# Altium PCB FC_RGB.PcbDoc
Units mil, origin at the board's own origin, x right, y up, seen from the top; angles counter-clockwise.
Board outline 3865.84 x 2095.61 mil, 2 copper layers (Top Layer, Bottom Layer); 76 components, 155 nets, 489 pads, 66 vias.
Unrouted connection lines stored in the file: 5.
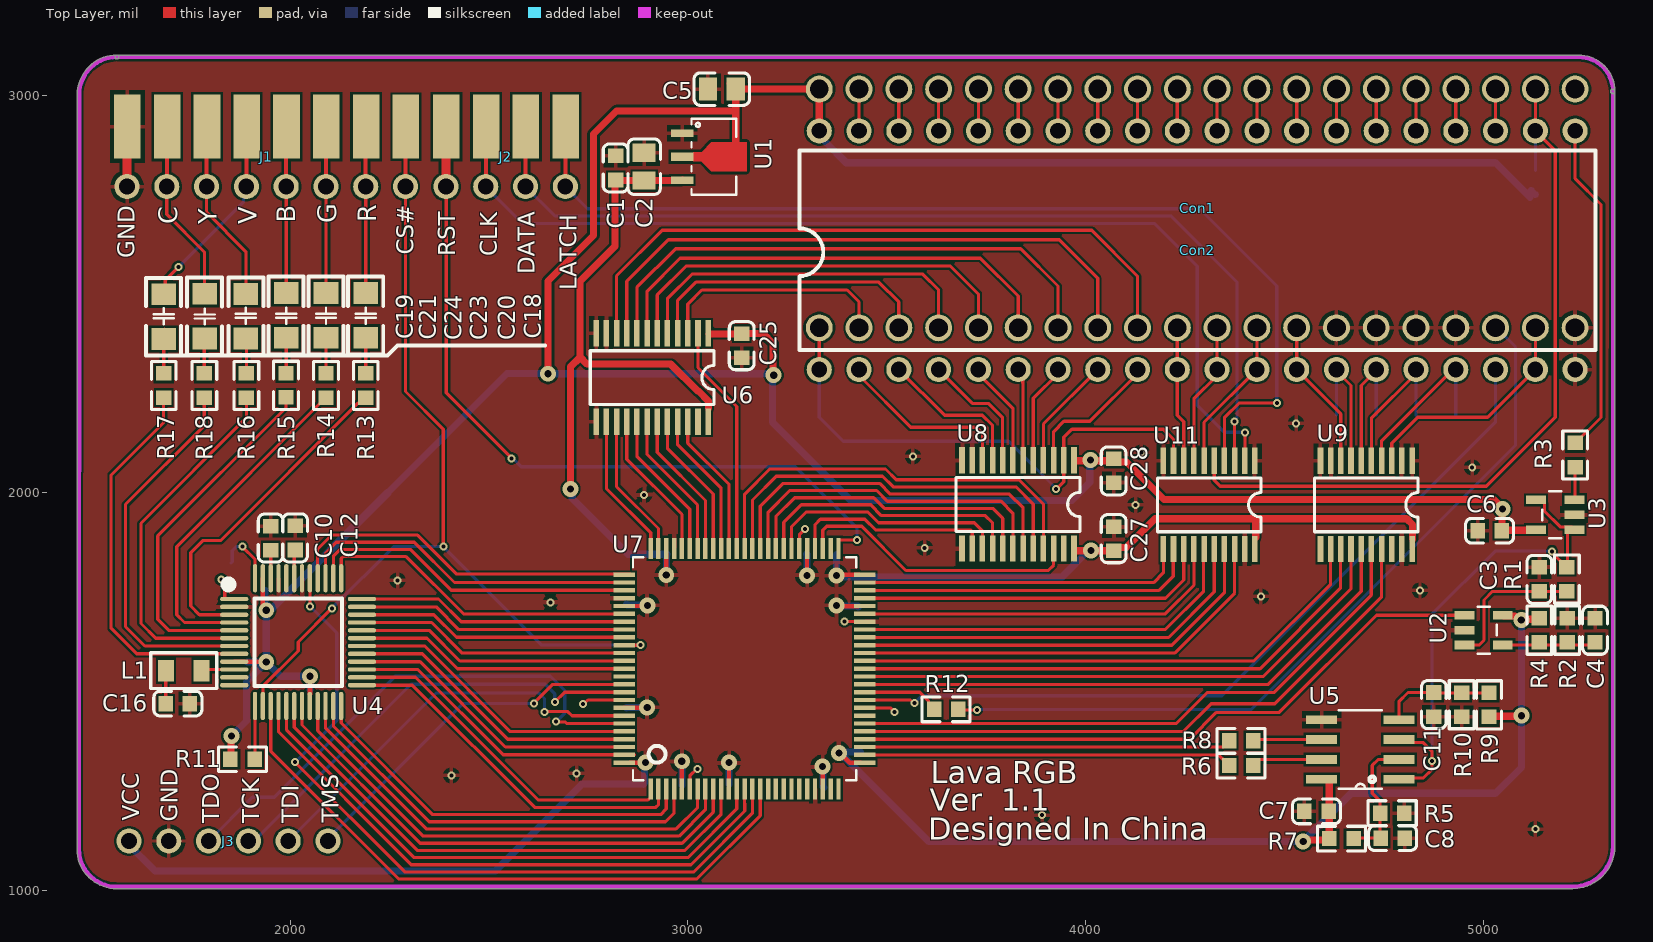
[diagram p0: Top Layer view]
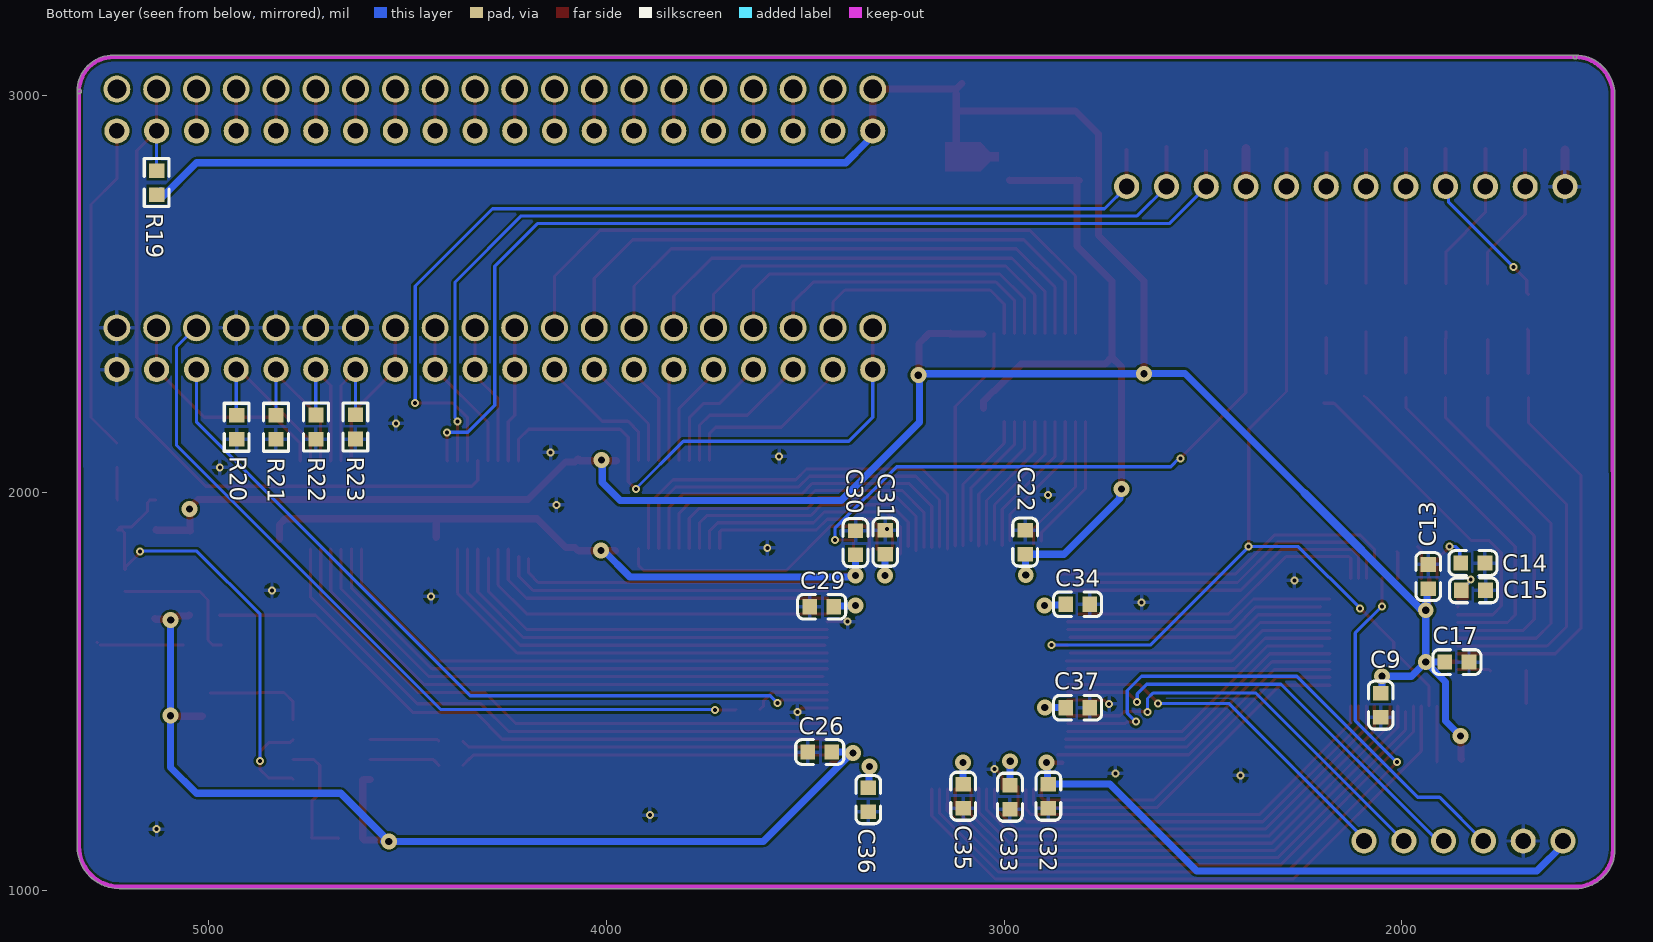
[diagram p1: Bottom Layer view, seen from below]
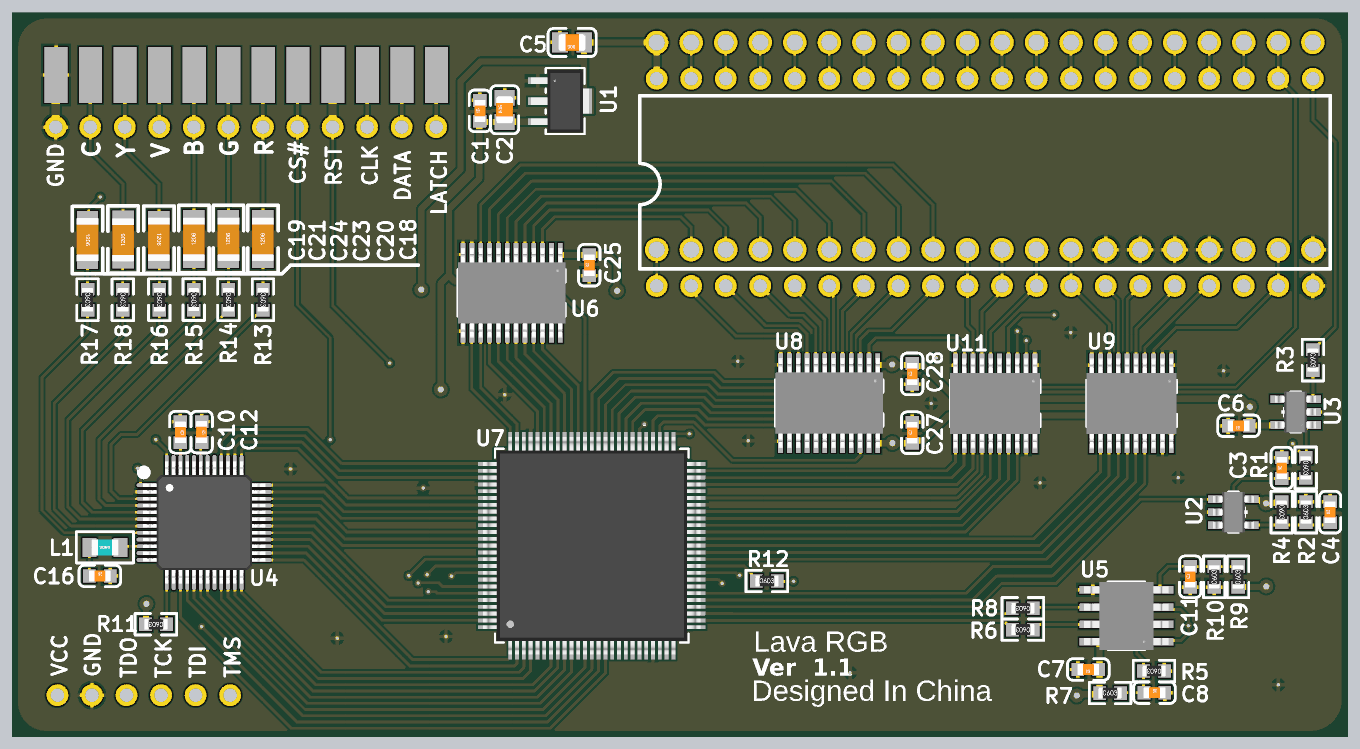
[diagram p2: 3D render of the assembled board from above, using the file's embedded part models]
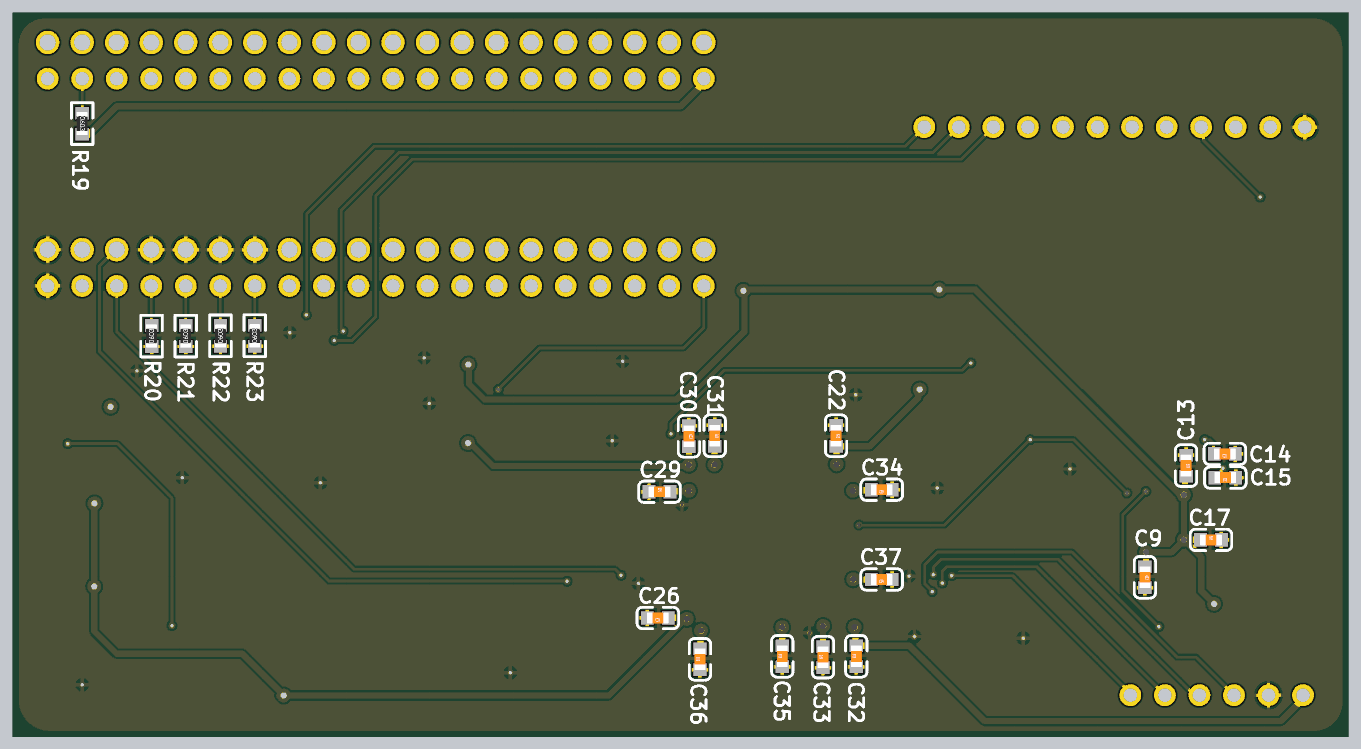
[diagram p3: 3D render of the assembled board from below, using the file's embedded part models]

## Layer stack, top to bottom
Top Solder: solder mask 0.4, Solder Resist, Dk 3.5
Top Layer: signal copper 1.4
Dielectric 1: dielectric 12.6, FR-4, Dk 4.8
Bottom Layer: signal copper 1.4
Bottom Solder: solder mask 0.4, Solder Resist, Dk 3.5

## Board outline
1464.28,1104.59 ccw(c1564.06,1104.83) 1564.15,1005.05 5223.7,1005.39 ccw(c5223.7,1010.38) 5223.71,1005.39 ccw(c5223.46,1111.67) 5329.74,1111.67 ccw(c5223.46,1111.67) 5329.74,1111.77 5330.12,3009.32 cw(c5324.69,3009.32) 5330.12,3009.33 ccw(c5238.72,3009.11) 5238.63,3100.52 1564.58,3100.67 cw(c1564.57,3095.7) 1564.57,3100.67 ccw(c1564.8,3000.84) 1464.98,3000.74 1464.28,1104.61 ccw(c1469.13,1104.61)

## Design rules (kind name [scope] priority, off if disabled: settings)
Clearance [All] p1: gap=6 ignorepadtopadclearanceinfootprint=FALSE except(0: Arc-Hole Track-Hole SMDPad-Hole THPad-Hole Via-Hole Fill-Hole Poly-Hole Region-Hole Text-Hole)
PolygonConnect [All] p1: connectstyle=Relief reliefconductorwidth=10 reliefentries=4 polygonreliefangle="90 Angle" airgapwidth=10
RoutingVias [All] p1: holewidth=28 width=50 viastyle="Through Hole" minholewidth=28 minwidth=50 maxholewidth=28 maxwidth=50
SilkToSolderMaskClearance [IsPad] p1: minsilkscreentomaskgap=6 clearancetoexposedcopper=TRUE
SolderMaskExpansion [All] p1: expansion=4 istentingtop=FALSE
Width Width_3V3 [InNet('+3.3')] p1: maxlimit=30 minlimit=10 preferedwidth=18 minimp=50.000000 maximp=50.000000 favimp=50.000000
Width Width_5V [InNet('+5')] p2: maxlimit=30 minlimit=10 preferedwidth=18 minimp=50.000000 maximp=50.000000 favimp=50.000000
Width [All] p3: maxlimit=38 minlimit=8 preferedwidth=8 minimp=50.000000 maximp=50.000000 favimp=50.000000
29 further rules are at their usual default settings.

## Components (designator, comment, footprint, x,y, rotation, side; value= is the part's Value field where it differs from the comment)
C1 "100nF" 0603_C 2818.04,2816.76 r90 top
C2 "2.2uF" 0805_C 2890,2820 r90 top
C3 "0.2nF" 0603_C 5140.05,1782.62 r90 top
C4 "100nF" 0603_C 5279.89,1654.79 r90 top
C5 "2.2uF" 0805_C 3085.04,3015 r180 top
C6 "100nF" 0603_C 5015,1905 r180 top
C7 "100nF" 0603_C 4579.87,1199.5 r180 top
C8 "0.2nF" 0603_C 4771.23,1132.2 r0 top
C9 "100nF" 0603_C 2053.01,1466.41 r270 bottom
C10 "100nF" 0603_C 2012.55,1886.82 r270 top
C11 "0.2nF" 0603_C 4874.91,1467.98 r90 top
C12 "100nF" 0603_C 1950.91,1886.41 r270 top
C13 "100nF" 0603_C 1933.65,1789.8 r270 bottom
C14 "100nF" 0603_C 1821.35,1823.75 r0 bottom
C15 "100nF" 0603_C 1820,1755 r0 bottom
C16 "27pF" 0603_C 1717.72,1470.38 r0 top
C17 "100nF" 0603_C 1861.52,1574.81 r180 bottom
C18 "220uF" "C 1206_L" 2190,2445 r90 top
C19 "220uF" "C 1206_L" 1682,2444.24 r270 top
C20 "220uF" "C 1206_L" 2090,2445 r90 top
C21 "0.047uF" "C 1206_L" 1785.19,2443.44 r90 top
C22 "100nF" 0603_C 2946.9,1876.22 r270 bottom
C23 "220uF" "C 1206_L" 1990,2445 r90 top
C24 "220uF" "C 1206_L" 1888.7,2445.06 r270 top
C25 "100nF" 0603_C 3135,2370 r90 top
C26 "100nF" 0603_C 3463.16,1348.65 r0 bottom
C27 "100nF" 0603_C 4070,1885 r90 top
C28 "100nF" 0603_C 4070,2055.32 r90 top
C29 "100nF" 0603_C 3458.4,1713.98 r180 bottom
C30 "100nF" 0603_C 3373.29,1874.82 r270 bottom
C31 "100nF" 0603_C 3298.51,1876.22 r270 bottom
C32 "100nF" 0603_C 2888.44,1237.52 r90 bottom
C33 "100nF" 0603_C 2985,1235 r90 bottom
C34 "100nF" 0603_C 2815,1720 r0 bottom
C35 "100nF" 0603_C 3102.78,1237.52 r90 bottom
C36 "100nF" 0603_C 3341.29,1228.97 r90 bottom
C37 "100nF" 0603_C 2815,1460 r0 bottom
Con1 "PPU_Connector_Src" DIP40_SRC 4280,2715 r90 top locked
Con2 "PPU_Connector_Dest" DIP40_DEST 4280,2610 r90 top locked
J1 "VOut_Connecter_8P" CON_VIDEO_OUT_8P 1290.97,2920.8 r0 top
J2 "JOY_Switch" CON_JOY 2692.67,2895.8 r180 top
J3 "PROGRAM_Conector" CON_PROGRAM 1595,1125 r0 top
L1 "68uH" "L 0805" 1732.67,1553.08 r180 top
R1 "680Ω" 0603_R 5209.32,1783.2 r270 top
R2 "680Ω" 0603_R 5209.99,1654.91 r90 top
R3 "100Ω" 0603_R 5230,2095.32 r270 top
R4 "10KΩ" 0603_R 5140,1655 r270 top
R5 "10KΩ" 0603_R 4770,1195 r180 top
R6 "100Ω" 0603_R 4390.43,1314.82 r180 top
R7 "16KΩ" 0603_R 4642.74,1131.13 r0 top
R8 "100Ω" 0603_R 4390.39,1376.74 r180 top
R9 "7.15KΩ" 0603_R 5013.55,1467.39 r90 top
R10 "10KΩ" 0603_R 4944.53,1467.51 r90 top
R11 "300Ω" 0603_R 1880.24,1330.44 r180 top
R12 "100Ω" 0603_R 3648.9,1455.84 r0 top
R13 "75Ω" 0603_R 2190,2270 r270 top
R14 "75Ω" 0603_R 2090,2270 r270 top
R15 "75Ω" 0603_R 1989.52,2270.38 r270 top
R16 "75Ω" 0603_R 1890,2270 r270 top
R17 "75Ω" 0603_R 1682.33,2270 r270 top
R18 "75Ω" 0603_R 1784.26,2270 r270 top
R19 "100KΩ" 0603_R 5130,2780 r270 bottom
R20 "10KΩ" 0603_R 4928.88,2165 r90 bottom
R21 "10KΩ" 0603_R 4830,2165 r90 bottom
R22 "10KΩ" 0603_R 4729.51,2165.5 r90 bottom
R23 "10KΩ" 0603_R 4630.31,2165.77 r90 bottom
U1 "MCP1703T-3302E/MB" SOT-89_3MC_MCH 3065,2845 r270 top
U2 "LMV7219M5X" MF05A 5000,1655 r0 top
U3 "SGM8051XN5/TR" MF05A 5180,1945 r180 top
U4 "BH7240AKV" LQFP48-7*7 2020,1625 r270 top locked
U5 "TLV3502AIDR" D8 4690,1355 r180 top
U6 "SN74LVC4245APWR" PW24 2910,2290 r270 top locked
U7 "LCMXO2-1200HC-4TG100I" TQFP100_LAT 3142.25,1558.11 r90 top locked
U8 "SN74LVC4245APWR" PW24 3829.57,1971 r270 top locked
U9 "SN74LVC541APW" PW20 4705,1970 r270 top locked
U11 "SN74LVC541APW" PW20 4310,1970 r270 top locked (schematic designator U1)

## Footprints (in the part's own frame and the unit in brackets; to place one, negate y for a bottom-side part, rotate by r counter-clockwise, add the part's x,y. Pads: shape width x height; smd on the part's side, far side on the other; paste and mask are expansions set on the pad)
0603_C [mm]
  rect 0.93x0.98 smd: 1(-0.77,0) 2(0.77,0)
  silkscreen extent -1.53,-0.79 1.54,0.79, body extent -0.8,-0.4 0.8,0.4, height 0.3
0603_R [mm]
  rect 0.93x0.98 smd: 1(-0.77,0) 2(0.77,0)
  silkscreen extent -1.53,-0.79 1.54,0.79, body extent -0.85,-0.4 0.85,0.4, height 0.56
0805_C [mm]
  rect 1.16x1.47 smd: 1(-0.89,0) 2(0.89,0)
  silkscreen extent -1.77,-1.04 1.77,1.04, body extent -1,-0.62 1,0.63, height 0.77
"C 1206_L" [mil] "无极性贴片电容"
  rect 55x62 smd: 1(-55.12,0) 2(57.09,0)
  silkscreen extent -96,-44 98,44, body extent -63,-32 63,32, height 48
CON_JOY [mm]
  rect 1.7x4.1 smd: 1(0,-0.635) 2(2.54,-0.635) 3(5.08,-0.635) 4(7.62,-0.635)
  round 1.6 hole 1: 1(0.025,3.195) 2(2.565,3.195) 3(5.105,3.195) 4(7.645,3.195)
  Top Layer lines w0.254: 5.105,3.195 5.105,0.914 ; 2.565,3.195 2.565,0.66 ; 0.025,3.195 0.025,0.864
  Top Layer lines w0.6: 7.645,3.195 7.645,0.787
CON_PROGRAM [mm]
  round 1.6 hole 1: 1(0,0) 2(2.54,0) 3(5.08,0) 4(7.62,0) 5(10.16,0) 6(12.7,0)
CON_VIDEO_OUT_8P [mm]
  round 1.6 hole 1: 1(7.595,-3.83) 2(10.135,-3.83) 3(12.675,-3.83) 4(15.215,-3.83) 5(17.755,-3.83) 6(20.295,-3.83) 7(22.835,-3.83) 8(25.375,-3.83)
  rect 1.7x4.1 smd: 1(7.62,0) 2(10.16,0) 3(12.7,0) 4(15.24,0) 5(17.78,0) 6(20.32,0) 7(22.86,0) 8(25.4,0)
  Top Layer lines w0.254: 10.135,-3.83 10.135,-1.499 ; 12.675,-3.83 12.675,-1.422 ; 15.215,-3.83 15.215,-1.422 ; 17.755,-3.83 17.755,-1.422 ; 20.295,-3.83 20.295,-1.499 ; 22.835,-3.83 22.835,-1.676 ; 25.375,-3.83 25.375,-1.422
  Top Layer lines w0.6: 7.595,-3.83 7.595,-1.499
D8 [mil]
  rect 78x22 smd: 1(-97,75) 2(-97,25) 3(-97,-25) 4(-97,-75) 5(97,-75) 6(97,-25) 7(97,25) 8(97,75)
  silkscreen extent -54,-98 54,98, body extent -122,-99 122,99, height 69
DIP40_DEST [mm]
  round 1.6 hole 1: 1(-7.62,24.13) 2(-7.62,21.59) 3(-7.62,19.05) 4(-7.62,16.51) 5(-7.62,13.97) 6(-7.62,11.43) 7(-7.62,8.89) 8(-7.62,6.35) 9(-7.62,3.81) 10(-7.62,1.27) 11(-7.62,-1.27) 12(-7.62,-3.81) 13(-7.62,-6.35) 14(-7.62,-8.89) 15(-7.62,-11.43) 16(-7.62,-13.97) 17(-7.62,-16.51) 18(-7.62,-19.05) 19(-7.62,-21.59) 20(-7.62,-24.13) 21(7.62,-24.13) 22(7.62,-21.59) 23(7.62,-19.05) 24(7.62,-16.51) 25(7.62,-13.97) 26(7.62,-11.43) 27(7.62,-8.89) 28(7.62,-6.35) 29(7.62,-3.81) 30(7.62,-1.27) 31(7.62,1.27) 32(7.62,3.81) 33(7.62,6.35) 34(7.62,8.89) 35(7.62,11.43) 36(7.62,13.97) 37(7.62,16.51) 38(7.62,19.05) 39(7.62,21.59) 40(7.62,24.13)
  silkscreen extent -6.36,-25.42 6.37,25.38
DIP40_SRC [mm]
  round 1.72 hole 1.2: 1(-7.62,24.13) 2(-7.62,21.59) 3(-7.62,19.05) 4(-7.62,16.51) 5(-7.62,13.97) 6(-7.62,11.43) 7(-7.62,8.89) 8(-7.62,6.35) 9(-7.62,3.81) 10(-7.62,1.27) 11(-7.62,-1.27) 12(-7.62,-3.81) 13(-7.62,-6.35) 14(-7.62,-8.89) 15(-7.62,-11.43) 16(-7.62,-13.97) 17(-7.62,-16.51) 18(-7.62,-19.05) 19(-7.62,-21.59) 20(-7.62,-24.13) 21(7.62,-24.13) 22(7.62,-21.59) 23(7.62,-19.05) 24(7.62,-16.51) 25(7.62,-13.97) 26(7.62,-11.43) 27(7.62,-8.89) 28(7.62,-6.35) 29(7.62,-3.81) 30(7.62,-1.27) 31(7.62,1.27) 32(7.62,3.81) 33(7.62,6.35) 34(7.62,8.89) 35(7.62,11.43) 36(7.62,13.97) 37(7.62,16.51) 38(7.62,19.05) 39(7.62,21.59) 40(7.62,24.13)
"L 0805" [mil] "小功率贴片电感"
  rect 40x55 smd: 1(-45,0) 2(45,0)
  silkscreen extent -83,-45 83,45, body extent -39,-24 39,24, height 35
LQFP48-7*7 [mm] "7x7mm，0.5mm"
  oval 0.279x1.8 smd: 1(-2.75,-4.075) 2(-2.25,-4.075) 3(-1.75,-4.075) 4(-1.25,-4.075) 5(-0.75,-4.075) 6(-0.25,-4.075) 7(0.25,-4.075) 8(0.75,-4.075) 9(1.25,-4.075) 10(1.75,-4.075) 11(2.25,-4.075) 12(2.75,-4.075) 25(2.75,4.075) 26(2.25,4.075) 27(1.75,4.075) 28(1.25,4.075) 29(0.75,4.075) 30(0.25,4.075) 31(-0.25,4.075) 32(-0.75,4.075) 33(-1.25,4.075) 34(-1.75,4.075) 35(-2.25,4.075) 36(-2.75,4.075)
  oval 1.8x0.279 smd: 13(4.075,-2.75) 14(4.075,-2.25) 15(4.075,-1.75) 16(4.075,-1.25) 17(4.075,-0.75) 18(4.075,-0.25) 19(4.075,0.25) 20(4.075,0.75) 21(4.075,1.25) 22(4.075,1.75) 23(4.075,2.25) 24(4.075,2.75) 37(-4.075,2.75) 38(-4.075,2.25) 39(-4.075,1.75) 40(-4.075,1.25) 41(-4.075,0.75) 42(-4.075,0.25) 43(-4.075,-0.25) 44(-4.075,-0.75) 45(-4.075,-1.25) 46(-4.075,-1.75) 47(-4.075,-2.25) 48(-4.075,-2.75)
  silkscreen extent -3.93,-4.69 2.79,2.79, body extent -4.5,-4.5 4.5,4.5, height 1.45
MF05A [mil]
  rect 50x22 smd: 1(-48,37.5) 2(-48,0) 3(-48,-37.5) 4(48,-37.5) 5(48,37.5)
  silkscreen extent -15,-59 33,59, body extent -59,-59 59,59, height 48
PW20 [mil]
  rect 66x14 smd: 1(-111,115.16) 2(-111,89.57) 3(-111,63.98) 4(-111,38.39) 5(-111,12.8) 6(-111,-12.8) 7(-111,-38.39) 8(-111,-63.98) 9(-111,-89.57) 10(-111,-115.16) 11(111,-115.16) 12(111,-89.57) 13(111,-63.98) 14(111,-38.39) 15(111,-12.8) 16(111,12.8) 17(111,38.39) 18(111,63.98) 19(111,89.57) 20(111,115.16)
  silkscreen extent -68,-130 68,130, body extent -130,-130 130,130, height 47
PW24 [mil]
  rect 66x14 smd: 1(-111,140.75) 2(-111,115.16) 3(-111,89.57) 4(-111,63.98) 5(-111,38.39) 6(-111,12.8) 7(-111,-12.8) 8(-111,-38.39) 9(-111,-63.98) 10(-111,-89.57) 11(-111,-115.16) 12(-111,-140.75) 13(111,-140.75) 14(111,-115.16) 15(111,-89.57) 16(111,-63.98) 17(111,-38.39) 18(111,-12.8) 19(111,12.8) 20(111,38.39) 21(111,63.98) 22(111,89.57) 23(111,115.16) 24(111,140.75)
  silkscreen extent -67,-156 68,156, body extent -130,-156 130,156, height 47
SOT-89_3MC_MCH [mil]
  rect 19x56 smd paste+0 mask+0: 1(-59.06,-79.18) 3(59.06,-79.18)
  rect 22x56 smd paste+0 mask+0: 2(0,-79.18)
  Top Layer region: 11,-51.18 -11,-51.18 -11,-30.82 -37,-6.82 -37,83.18 37,83.18 37,-6.82 11,-31.82
  silkscreen extent -96,-56 96,56, body extent -91,-99 91,69, height 65
TQFP100_LAT [mil]
  rect 53.5x11 smd paste+0 mask+0: 1(-302.25,236.22) 2(-302.25,216.54) 3(-302.25,196.85) 4(-302.25,177.17) 5(-302.25,157.48) 6(-302.25,137.8) 7(-302.25,118.11) 8(-302.25,98.43) 9(-302.25,78.74) 10(-302.25,59.06) 11(-302.25,39.37) 12(-302.25,19.69) 13(-302.25,0) 14(-302.25,-19.68) 15(-302.25,-39.37) 16(-302.25,-59.06) 17(-302.25,-78.74) 18(-302.25,-98.43) 19(-302.25,-118.11) 20(-302.25,-137.8) 21(-302.25,-157.48) 22(-302.25,-177.17) 23(-302.25,-196.85) 24(-302.25,-216.54) 25(-302.25,-236.22) 51(302.25,-236.22) 52(302.25,-216.54) 53(302.25,-196.85) 54(302.25,-177.17) 55(302.25,-157.48) 56(302.25,-137.8) 57(302.25,-118.11) 58(302.25,-98.43) 59(302.25,-78.74) 60(302.25,-59.06) 61(302.25,-39.37) 62(302.25,-19.68) 63(302.25,0) 64(302.25,19.68) 65(302.25,39.37) 66(302.25,59.06) 67(302.25,78.74) 68(302.25,98.43) 69(302.25,118.11) 70(302.25,137.8) 71(302.25,157.48) 72(302.25,177.17) 73(302.25,196.85) 74(302.25,216.54) 75(302.25,236.22)
  rect 11x53.5 smd paste+0 mask+0: 26(-236.22,-302.25) 27(-216.54,-302.25) 28(-196.85,-302.25) 29(-177.17,-302.25) 30(-157.48,-302.25) 31(-137.8,-302.25) 32(-118.11,-302.25) 33(-98.43,-302.25) 34(-78.74,-302.25) 35(-59.06,-302.25) 36(-39.37,-302.25) 37(-19.69,-302.25) 38(0,-302.25) 39(19.68,-302.25) 40(39.37,-302.25) 41(59.06,-302.25) 42(78.74,-302.25) 43(98.43,-302.25) 44(118.11,-302.25) 45(137.8,-302.25) 46(157.48,-302.25) 47(177.17,-302.25) 48(196.85,-302.25) 49(216.54,-302.25) 50(236.22,-302.25) 76(236.22,302.25) 77(216.54,302.25) 78(196.85,302.25) 79(177.17,302.25) 80(157.48,302.25) 81(137.8,302.25) 82(118.11,302.25) 83(98.43,302.25) 84(78.74,302.25) 85(59.06,302.25) 86(39.37,302.25) 87(19.68,302.25) 88(0,302.25) 89(-19.69,302.25) 90(-39.37,302.25) 91(-59.06,302.25) 92(-78.74,302.25) 93(-98.43,302.25) 94(-118.11,302.25) 95(-137.8,302.25) 96(-157.48,302.25) 97(-177.17,302.25) 98(-196.85,302.25) 99(-216.54,302.25) 100(-236.22,302.25)
  silkscreen extent -280,-280 280,280, body extent -315,-315 315,315, height 63

## Part data
C1 C3 C4 C6 C7 C8 C9 C10 C11 C12 C13 C14 C15 C16 C17 C22 C25 C26 C27 C28 C29 C30 C31 C32 C33 C34 C35 C36 C37: library part C0603, "No Description Available", Manufacturer_Part_Number=C0603X394K4RACAUTO, Mfr_Name=Kemet, Copyright="Copyright (C) 2022 Ultra Librarian. All rights reserved.", RefDes=RefDes, Type=DEV
C2 C5: library part C0805, "No Description Available", Manufacturer_Part_Number=C0603X394K4RACAUTO, Mfr_Name=Kemet, Copyright="Copyright (C) 2022 Ultra Librarian. All rights reserved.", RefDes=RefDes, Type=DEV
C18 C19 C20 C21 C23 C24: library part C1206, "No Description Available", Manufacturer_Part_Number=C0603X394K4RACAUTO, Mfr_Name=Kemet, Copyright="Copyright (C) 2022 Ultra Librarian. All rights reserved.", RefDes=RefDes, Type=DEV
L1: library part L0805
R1 R2 R3 R4 R5 R6 R7 R8 R9 R10 R11 R12 R13 R14 R15 R16 R17 R18 R19 R20 R21 R22 R23: library part R0603, "No Description Available", Manufacturer_Part_Number=RC0603FR-07200RL, Mfr_Name=Yageo, Copyright="Copyright (C) 2022 Ultra Librarian. All rights reserved.", RefDes=RefDes, Type=DEV
U1: "No Description Available", Mfr_Name=Microchip, Copyright="Copyright (C) 2022 Ultra Librarian. All rights reserved.", Manufacturer_Part_Number=MCP1703T-3302E/MB, RefDes=RefDes, Type=DEV
U2: "C14A", Manufacturer_Part_Number=MCP1703T-3302E/MB, Mfr_Name=Microchip, Copyright="Copyright (C) 2022 Ultra Librarian. All rights reserved.", RefDes=RefDes, Type=DEV
U3: library part SGM808051XN5/TR, "8051", Manufacturer_Part_Number=MCP1703T-3302E/MB, Mfr_Name=Microchip, Copyright="Copyright (C) 2022 Ultra Librarian. All rights reserved.", RefDes=RefDes, Type=DEV
U4: "No Description Available", Manufacturer_Part_Number=ADV7123JSTZ330, Mfr_Name="Analog Devices Inc", Copyright="Copyright (C) 2022 Ultra Librarian. All rights reserved.", RefDes=RefDes, Type=DEV
U5: library part TLV3502AIDCNR, "NXC", Mfr_Name="Texas Instruments", Copyright="Copyright (C) 2022 Ultra Librarian. All rights reserved.", Manufacturer_Part_Number=TLV3502AIDCNR, RefDes=RefDes, Type=DEV
U6 U8: "LJ245A", Mfr_Name="Texas Instruments", Copyright="Copyright (C) 2022 Ultra Librarian. All rights reserved.", Manufacturer_Part_Number=SN74LVC4245APWR, RefDes=RefDes, Type=DEV
U7: library part LCMXO2-1200HC, "No Description Available", Mfr_Name=Lattice, Copyright="Copyright (C) 2023 Ultra Librarian. All rights reserved.", Manufacturer_Part_Number=LCMXO2-1200HC-4TG100I, RefDes=RefDes, Type=DEV
U9 U11: "LC541A", Mfr_Name="Texas Instruments", Copyright="Copyright (C) 2022 Ultra Librarian. All rights reserved.", Manufacturer_Part_Number=SN74LVC541APW, RefDes=RefDes, Type=DEV

## Via types
v1: diameter 20, hole 10, Top Layer to Bottom Layer, tented both sides, 42 vias
v2: diameter 40, hole 18, Top Layer to Bottom Layer, tented both sides, 24 vias

## Nets (pads, with @x,y where several pads share a name; then routed paths per layer and width w, separated by ;. In a path a pad name is that pad's centre, name@x,y a point inside that pad or via, vN(x,y) a via of type N, cw(c..) or ccw(c..) an arc to the next point about the centre after c; other vN are vias at no path point)
+3.3: C1.1 C2.1 C7.1 C22.2 C26.1 C27.1 C29.2 C30.2 C31.2 C32.2 C33.2 C34.2 C35.2 C36.2 C37.2 J3.1 R4.1 R7.1 R9.1 U1.3 U2.5 U5.8 U6.24 U7.5 U7.11 U7.23 U7.26 U7.46 U7.50 U7.55 U7.73 U7.80 U7.93 U7.100 U8.24 U9.20 U11.20 | length 8679.2
  Top Layer w11: U7.93 v2@2894.68,1459.68 ; U7.100@2853.54,1321.94 v2@2893.04,1321.94 ; U7.80@2857.7,1715.74 v2@2890,1715.74 ; v2(2945.33,1793.32) U7.73@2945.33,1848 ; U7.5@2984.48,1270.7 v2(2984.48,1325.39) ; U7.11@3103.18,1267.61 v2@3103.18,1322.03 ; v2(3299.32,1792.6) U7.55@3299.32,1847.29 ; U7.23@3339.14,1266.14 v2@3339.14,1305 ; v2@3374.76,1715.41 U7.46@3427.98,1715.41 ; v2@3375.93,1794.17 U7.50@3430.62,1794.17 ; v2(3379.38,1346) 3382.31,1346 3406.65,1321.66 U7.26@3434.59,1321.66
  Top Layer w18: v2(2705,2010) 2705,2317.1 2728.95,2341.05 ; C1.1@2810,2784.96 2875,2784.96 2875.49,2785.45 2985.33,2785.45 U1.3 ; C1.1 2816.18,2784.58 2816.18,2619.56 2728.95,2532.34 2728.95,2341.05 ; v2@2895.43,1458.62 v2(2897.46,1460.64) ; v2@2897.8,1716.69 v2(2898.14,1717.03) v2@2898.82,1717.72 ; 3024.32,2256 2956.71,2323.6 2746.4,2323.6 2728.95,2341.05 ; 3026.2,2255.95 3051.16,2231 U6.24@3051.16,2211.74 ; v2@3098.93,1332.67 3098.93,1326.24 v2(3103.14,1322.03) v2@3103.14,1327.98 ; v2(3299.32,1792.6) v2@3299.6,1792.32 ; v2@3372.85,1792.32 v2(3373.14,1792.03) ; v2(3373.14,1717.03) 3374.76,1715.41 v2@3376.26,1713.91 ; U8.24@3976.37,1854.73 C27.1 ; C27.1 4078.05,1862.74 4101.73,1862.74 4173.99,1935 4427.32,1935 ; U11.20@4427.32,1888.09 4427.32,1935 ; v2(4546.4,1124.13) 4549.95,1127.68 4608.4,1127.68 4611.95,1131.23 4611.95,1278 4609.95,1280 U5.8 ; U9.20@4821.05,1883 4821.05,1920.41 4806.46,1935 4427.32,1935 ; R9.1@5015.5,1439.03 5016,1438.53 5093.65,1438.53 v2(5095.1,1439.98) ; U2.5 5050,1690.5 5078.67,1690.5 5088.71,1680.46 v2(5094.66,1680.46) 5096.63,1682.43 5132.78,1682.43 R4.1@5134.75,1684.4
  Bottom Layer w18: J3.1 1595,1115 1660,1050 2516.01,1050 2734.06,1268.05 C32.2@2888.22,1268.05 ; v2(2705,2010) 2709.21,2005.79 2709.21,1985.79 2849.1,1845.9 C22.2@2945.92,1845.9 ; C37.2 2845.64,1460.32 2897.14,1460.32 v2(2897.46,1460.64) ; C34.2 2846.8,1718.52 2896.65,1718.52 v2(2898.14,1717.03) ; C32.2 C32.2@2888.22,1268.05 ; v2(2893.4,1322.31) 2890.92,1319.83 2890.92,1270.76 C32.2@2888.22,1268.05 ; v2(2945.33,1793.32) 2946.11,1794.11 2946.11,1845.11 C22.2 ; v2(2984.48,1325.39) 2984.74,1325.13 2984.74,1265.57 C33.2 ; C35.2 3102.96,1268.01 3102.96,1321.86 v2(3103.14,1322.03) ; C31.2 3298.91,1845.5 3298.91,1793 v2(3299.32,1792.6) ; v2(3338.14,1312.03) 3339.71,1310.45 3339.71,1260.86 C36.2 ; v2(3373.14,1717.03) 3374.66,1715.5 3426.55,1715.5 C29.2 ; v2(3373.14,1792.03) C30.2@3373.14,1844.35 ; C30.2 3373.29,1792.03 3376.29,1789.03 3940.68,1789.03 4006.72,1855.08 v2(4012.68,1855.08) ; v2(3379.38,1346) 3382.53,1349.15 3432.35,1349.15 C26.1 ; v2@3379.88,1349.15 3604.9,1124.13 v2(4546.4,1124.13) ; v2@4559.27,1124.13 v2(4546.4,1124.13) ; v2(5094.66,1680.46) 5094.83,1680.29 5094.83,1445.17 5095,1445 5095,1310 5030.12,1245.12 4667.39,1245.12 v2(4546.4,1124.13)
+5: C5.1 C6.1 C9.1 C13.2 C17.1 C25.2 C28.2 Con1.40 Con2.40 R11.2 R19.2 U1.2 U3.5 U4.9 U4.20 U4.47 U6.1 U8.1 | length 8424.9
  Top Layer w8: U4.9 U4.9@1859.94,1575.39
  Top Layer w11: U4.9 1889.48,1575.79 1939.22,1575.78 v2(1940,1575) ; U4.47@1931.42,1785.27 1931.42,1713.58 v2(1940,1705)
  Top Layer w12: U4.20@2049.67,1493.98 v2@2049.67,1539.05
  Top Layer w18: R11.2 1851.3,1331.81 1851.3,1387.94 v2(1852.67,1389.31) ; v2(2648.15,2299.54) 2648.15,2532.75 2762.39,2646.99 2762.39,2902.39 2820,2960 3120,2960 ; U6.1@3052.75,2399.73 3134.9,2399.89 C25.2@3136.41,2399.89 ; C5.1@3106.24,3028.83 C5.1 Con1.40 Con2.40 ; 3120,2839.02 3120,2960 ; C5.1@3120,3004.02 3120,2960 ; C25.2@3134.9,2401.11 3135.69,2400.32 C25.2 ; C25.2@3135.98,2400.32 3189.46,2400.32 3213.99,2375.78 3213.99,2297.3 v2(3215.43,2295.86) ; U8.1@3974.69,2081 4065.37,2081 C28.2 ; C28.2@4070.98,2085.63 4078.69,2077.92 4102.08,2077.92 4196.4,1983.6 5026.1,1983.6 5047.65,1962.05 v2(5047.65,1959.92) 5046.48,1958.75 5046.48,1906.17 C6.1 5046.56,1906.25 5130.75,1906.25 U3.5
  Bottom Layer w8: v2(1940,1705) 1943.83,1708.83 1946.12,1711.12 v2@1946.12,1721.32
  Bottom Layer w18: v2(1852.67,1389.31) 1890,1426.64 1890,1525 v2@1939.91,1574.91 ; C17.1@1891.93,1574.91 v2@1939.91,1574.91 ; C13.2@1937.66,1754.43 1936.82,1753.6 1936.82,1708.18 v2(1940,1705) v2(1940,1575) ; v2(2049.65,1539.08) 1975.92,1539.08 v2(1940,1575) ; C9.1@2050,1505 v2@2050,1538.72 ; 2245,2000 2545,2300 2647.69,2300 v2(2648.15,2299.54) 3211.75,2299.54 v2(3215.43,2295.86) 3212.37,2292.81 3212.37,2177.63 3409,1981 3964.76,1981 4009.99,2026.23 4009.99,2080.62 v2(4011.9,2082.53) ; Con2.40 3330,2897.83 3347.26,2880.56 3397.8,2830 5030,2830 R19.2@5116.65,2743.35 ; R19.2@5119.71,2759.98 5119.71,2758.99 5129.02,2749.68 R19.2 ; v2@1939.91,1574.91 v2(1940,1575)
  Bottom Layer w20: v2@1943.83,1708.83 1953.83,1708.83 2245,2000
/RST: Con1.22 Con2.22 R19.1 U11.5 | length 1929.2
  Top Layer w8: U11.5@4322.96,2080.83 4322.96,2032.04 4338.09,2016.91 5006.91,2016.91 5180,2190 5180,2860 Con2.22 Con1.22
  Bottom Layer w8: R19.1 Con2.22
BOUT: C23.2 J1.5 | length 242.9
  Top Layer w8: C23.2@1990,2527.09 J1.5@1990,2770
COUT: C21.2 J1.2 | length 283.6
  Top Layer w8: J1.2@1690,2770 1690,2700 1784.59,2605.41 C21.2@1784.59,2525.59
CPU_A0: Con1.12 Con2.12 U11.6 | length 389
  Top Layer w8: U11.6 4297.2,2177.2 Con2.12 Con1.12
CPU_A0_3V3: U7.45 U11.14 | length 948.3
  Top Layer w8: U7.45 4199.66,1695.91 4271.93,1768.18 4271.93,1858.68 U11.14
CPU_A1: Con1.11 Con2.11 U11.7 | length 358.2
  Top Layer w8: U11.7 4271.61,2236.61 4330,2295 Con1.11
CPU_A1_3V3: U7.47 U11.13 | length 898.4
  Top Layer w8: U7.47 4200.28,1735.28 4246.02,1781.02 U11.13
CPU_A2: Con1.10 Con2.10 U11.8 | length 340.6
  Top Layer w8: Con1.10 Con2.10 4230,2195 4246.02,2178.98 U11.8
CPU_A2_3V3: U7.48 U11.12 | length 839.7
  Top Layer w8: U7.48 4184.36,1754.96 4220,1790.6 U11.12@4220,1840
CPU_R/W: Con1.1 Con2.1 U8.2 U11.9 | length 1382.2
  Top Layer w8: Con2.1 Con1.1 ; v1(3925,2010) 3926.67,2010 3944.72,2028.06 U8.2 3944.72,2139.72 3965,2160 4195,2160 4220.43,2134.57 U11.9
  Bottom Layer w8: Con2.1 3330,2190 3390,2130 3806.01,2130 3925,2011.01 v1(3925,2010)
CPU_R/W_3V3: U7.49 U11.11 | length 796.4
  Top Layer w8: U7.49 4170.33,1774.65 4195,1799.31 U11.11@4195,1835
CPU_SIDE_D0_3V3: U6.21 U7.66 | length 344.9
  Top Layer w8: U6.21 2973.98,2121.02 3083.38,2011.62 U7.66@3083.38,1879.4
CPU_SIDE_D0_5V: Con1.2 U6.3 | length 596.2
  Top Layer w8: U6.3 2999.57,2474.57 3035.11,2510.11 3399.89,2510.11 3430,2480 Con1.2
CPU_SIDE_D1_3V3: U6.20 U7.67 | length 359.2
  Top Layer w8: U6.20 2948.39,2112.07 3063.32,1997.13 U7.67@3063.32,1867.38
CPU_SIDE_D1_5V: Con1.3 U6.4 | length 743.8
  Top Layer w8: U6.4 2973.98,2483.98 3020,2530 3480,2530 3530,2480 Con1.3
CPU_SIDE_D2_3V3: U6.19 U7.68 | length 357.6
  Top Layer w8: U6.19 2922.8,2102.2 3044.01,1980.99 U7.68@3044.01,1871.64
CPU_SIDE_D2_5V: Con1.4 U6.5 | length 906.1
  Top Layer w8: U6.5 2948.39,2488.39 3010,2550 3590,2550 3630,2510 Con1.4
CPU_SIDE_D3_3V3: U6.18 U7.69 | length 350
  Top Layer w8: U6.18 2897.2,2096.59 3023.95,1969.84 U7.69@3023.95,1881.49
CPU_SIDE_D3_5V: Con1.5 U6.6 | length 1047.9
  Top Layer w8: U6.6 2922.8,2497.8 2995,2570 3660,2570 3730,2500 Con1.5
CPU_SIDE_D4_3V3: U6.17 U7.70 | length 365.5
  Top Layer w8: U6.17 2871.61,2091.66 3004.27,1959 U7.70@3004.27,1868.43
CPU_SIDE_D4_5V: Con1.6 U6.7 | length 1192.6
  Top Layer w8: U6.7 2897.2,2507.2 2980,2590 3735,2590 3830,2495 Con1.6
CPU_SIDE_D5_3V3: U6.16 U7.71 | length 356.5
  Top Layer w8: U6.16@2846.09,2178.93 2846.09,2084.75 2984.95,1945.89 U7.71@2984.95,1879.95
CPU_SIDE_D5_5V: Con1.7 U6.8 | length 1358.1
  Top Layer w8: U6.8 2871.61,2516.61 2968.78,2613.78 3836.22,2613.78 3930,2520 Con1.7
CPU_SIDE_D6_3V3: U6.15 U7.74 | length 351.2
  Top Layer w8: U6.15 2820.43,2015.93 2925.9,1910.47 U7.74@2925.9,1871.44
CPU_SIDE_D6_5V: Con1.8 U6.9 | length 1522.9
  Top Layer w8: U6.9 2846.02,2531.65 2950.77,2636.4 3933.6,2636.4 4030,2540 Con1.8
CPU_SIDE_D7_3V3: U6.14 U7.75 | length 345.2
  Top Layer w8: U6.14 2794.84,2011.19 2906.21,1899.81 U7.75@2906.21,1879.96
CPU_SIDE_D7_5V: Con1.9 U6.10 | length 1679.1
  Top Layer w8: U6.10 2820.43,2545.43 2935,2660 4015,2660 4130,2545 Con1.9
CPU_SIDE_DIR: U6.2 U7.64 | length 575.2
  Top Layer w8: U6.2 3025.16,2314.84 3122.75,2217.25 U7.64@3122.75,1866.27
CPU_SIDE_OE: U6.22 U7.65 | length 355.1
  Top Layer w8: U6.22 2999.57,2125.22 3103.07,2021.72 U7.65@3103.07,1866.75
EXT0: Con2.14 R23.2 U9.7 | length 358.2
  Top Layer w8: Con2.14 4630,2306.5 4666.61,2269.89 U9.7
  Bottom Layer w8: Con2.14 4630,2196.4 R23.2
EXT0_3V3: U7.38 U9.13 | length 1378.5
  Top Layer w8: U7.38 4438.11,1558.11 4640,1760 4640,1857.98 U9.13
EXT1: Con2.15 R22.2 U9.6 | length 359
  Top Layer w8: U9.6 4692.2,2270.03 4730,2307.83 Con2.15
  Bottom Layer w8: R22.2 4730,2196.31 Con2.15
EXT1_3V3: U7.37 U9.14 | length 1402.7
  Top Layer w8: U7.37@3455.28,1538.39 4445.95,1538.39 4666.69,1759.12 4666.69,1798.31 4666.61,1798.38 U9.14
EXT2: Con2.16 R21.2 U9.5 | length 390.2
  Top Layer w8: U9.5 4717.8,2187.8 4830,2300 Con2.16
  Bottom Layer w8: R21.2 Con2.16
EXT2_3V3: U7.36 U9.15 | length 1451.4
  Top Layer w8: U7.36 4458.74,1518.74 4692.47,1752.47 4692.47,1858.73 U9.15
EXT3: Con2.17 R20.2 U9.4 | length 426.2
  Top Layer w8: U9.4 4743.39,2131.43 4921.96,2310 Con2.17
  Bottom Layer w8: R20.2 4930,2196.44 Con2.17
EXT3_3V3: U7.31 U9.16 | length 1522.9
  Top Layer w8: U7.31 3444.81,1420 4226.6,1420 4304.63,1498.03 4472.27,1498.03 4717.38,1743.13 4717.38,1858.58 U9.16
EXT4: R8.2 U7.28 | length 921.8
  Top Layer w8: U7.28@3445.38,1361.44 3551.66,1361.44 3551.93,1361.17 4345.49,1361.17 4360.07,1375.76 R8.2
FC_RST: J2.4 U7.51 | length 1788.2
  Top Layer w8: J2.4@2392.26,2769.45 2392.26,2251.36 v1(2556.94,2086.68) ; U7.51 3378.47,1880.37 3379.97,1881.87 v1(3425.12,1881.87)
  Bottom Layer w8: v1(2556.94,2086.68) 2560.19,2086.68 2581.06,2065.81 3270.01,2065.81 3425.12,1910.7 v1(3425.12,1881.87)
GND: C1.2 C2.2 C3.2 C4.2 C5.2 C6.2 C7.2 C8.2 C9.2 C10.1 C11.1 C12.1 C13.1 C14.1 C15.1 C16.2 C17.2 C22.1 C25.1 C26.2 C27.2 C28.1 C29.1 C30.1 C31.1 C32.1 C33.1 C34.1 C35.1 C36.1 C37.1 Con1.14 Con1.15 Con1.16 Con1.17 Con1.20 Con2.20 J1.1 J3.2 R2.2 R5.1 R10.1 R20.1 R21.1 R22.1 R23.1 U1.1 U2.2 U3.2 U4.2 U4.42 U4.45 U5.5 U6.11 U6.12 U6.13 U7.6 U7.22 U7.33 U7.44 U7.56 U7.72 U7.79 U7.92 U8.11 U8.12 U8.13 U9.1 U9.2 U9.9 U9.10 U9.19 U11.1 U11.10 U11.19 | length 354.6
  Top Layer w8: U4.2@1858.98,1714.16 U4.2 ; v1(2735.72,1469.89) 2738.97,1469.89 2748.45,1479.37 U7.92 ; U7.79@2839.82,1735.46 U7.79 ; U7.6 3004.73,1256.14 3004.73,1288.86 3021.34,1305.47 v1(3024.06,1305.47) ; U7.56 3280.05,1895.05 3294.26,1909.26 v1(3294.5,1909.26) ; v1(3393.15,1676.66) 3393.4,1676.41 3443.95,1676.41 U7.44@3444.32,1676.04 ; U7.33 3508.73,1459.68 3519.42,1449 v1(3519.42,1448.83)
  other v1: 5130,1155 3890,1190 2405,1290 2720,1295 2654.18,1724.85 4440,1740 4840,1755 2270,1780 3595.12,1861.87 4125,1970 2890,1995 4971.32,2064.15 3565.12,2091.87 4139.75,2101.69 4528.69,2175
GOUT: C20.2 J1.6 | length 242.9
  Top Layer w8: C20.2@2090,2527.09 J1.6@2090,2770
JOY_CLK: J2.3 U11.2 | length 2440.9
  Top Layer w8: U11.2 4399.89,2081.33 4399.89,2151.93 v1(4400.22,2152.25)
  Bottom Layer w8: J2.3@2491.71,2770 2584.67,2677.04 4172.96,2677.04 4280,2570 4280,2220 4347.75,2152.25 v1(4400.22,2152.25)
JOY_CLK_3V3: U7.40 U11.18 | length 1103
  Top Layer w8: U7.40 3444.69,1597.3 4223.26,1597.3 4373.98,1748.01 U11.18
JOY_DATA: J2.2 U11.3 | length 2339.2
  Top Layer w8: U11.3 4374.13,2081.15 4374.13,2179.11 v1(4374.28,2179.26)
  Bottom Layer w8: J2.2@2591.71,2770 2665.38,2696.33 4213.67,2696.33 4380,2530 4380,2188.22 4374.28,2182.51 v1(4374.28,2179.26)
JOY_DATA_3V3: U7.41 U11.17 | length 1063
  Top Layer w8: U7.41@3450,1616.98 4216.17,1616.98 4348.39,1749.19 U11.17
JOY_LATCH: J2.1 U11.4 | length 2442.6
  Top Layer w8: U11.4 4348.39,2188.78 4385.64,2226.03 v1(4480.92,2226.03)
  Bottom Layer w8: J2.1@2691.71,2770 2747.38,2714.33 4285.67,2714.33 4480,2520 v1@4480,2225
JOY_LATCH_3V3: U7.42 U11.16 | length 1033.5
  Top Layer w8: U7.42 3444.69,1636.67 4208.1,1636.67 4322.8,1751.36 U11.16
NetC3_1: C3.1 R1.2 U2.3 | length 357.5
  Top Layer w8: U2.3@4967,1617.5 4988.36,1617.5 5000.91,1630.05 5000.91,1730.91 5022.3,1752.3 5208.74,1752.3 R1.2
NetC4_1: C4.1 R2.1 R4.2 U2.4 | length 210.2
  Top Layer w8: U2.4@5063,1617.5 5134.75,1617.5 5196.66,1617.5 C4.1@5272.33,1617.5 ; C4.1@5279.4,1624.09 C4.1@5280,1624.69
NetC8_1: C8.1 R5.2 R7.2 U5.2 | length 333.4
  Top Layer w8: R7.2@4672.58,1131.23 4673.55,1132.2 C8.1 4739.68,1133.43 R5.2 4739.68,1225.32 4720,1245 4720,1315 4735,1330 U5.2
NetC10_2: C10.2 U4.43 | length 67.6
  Top Layer w8: U4.43@2009.97,1785.63 U4.43 2010.16,1849.87 C10.2@2012.22,1851.92
NetC11_2: C11.2 R9.2 R10.2 U5.4 | length 261.1
  Top Layer w8: U5.4 4787,1475.39 4809.9,1498.3 C11.2 ; C11.2@4877.1,1497.26 4936.94,1497.26 R9.2@4995.37,1497.26
NetC12_2: C12.2 U4.46 | length 83.2
  Top Layer w8: U4.46 1951.1,1856.1 C12.2@1960,1865
NetC14_2: C14.2 U4.48 | length 154.7
  Top Layer w8: v1(1880,1865) 1911.73,1833.27 U4.48
  Bottom Layer w8: C14.2 1854.51,1826.59 1854.51,1854.88 1864.63,1865 v1(1880,1865)
NetC15_2: C15.2 U4.1 | length 112.6
  Top Layer w8: v1(1826.82,1782.18) 1826.82,1780.25 1835.58,1771.49 1835.58,1734.65 1836.96,1733.27 U4.1
  Bottom Layer w8: v1(1826.82,1782.18) 1826.82,1779.48 1850.31,1755.98 C15.2
NetC16_1: C16.1 L1.2 | length 82.8
  Top Layer w8: C16.1 1687.41,1552.82 L1.2
NetC18_1: C18.1 R13.1 | length 89.6
  Top Layer w8: R13.1 C18.1
NetC19_2: C19.2 R17.1 | length 111.6
  Top Layer w8: R17.1 1682.33,2409.24 C19.2@1684.24,2411.16
NetC20_1: C20.1 R14.1 | length 104.7
  Top Layer w8: R14.1 C20.1 C20.1@2090,2405
NetC21_1: C21.1 R18.1 | length 84.6
  Top Layer w8: R18.1 C21.1@1784.26,2384.88
NetC23_1: C23.1 R15.1 | length 88.7
  Top Layer w8: R15.1@1990,2301.18 C23.1
NetC24_2: C24.2 R16.1 | length 104.7
  Top Layer w8: C24.2 C24.2@1888.7,2405.06 ; R16.1 C24.2@1890,2387.91
NetCon1_18: Con1.18 R12.2 | length 1998.6
  Top Layer w8: R12.2@3673.99,1455.85 3675.59,1454.26 3725.44,1454.26 v1(3726.06,1454.87)
  Bottom Layer w8: v1@3726.53,1455.35 4415.35,1455.35 5080,2120 5080,2366.94 5031.94,2415 Con1.18
NetCon1_23: Con1.23 Con2.23 | length 105
  Top Layer w8: Con2.23 Con1.23
NetCon1_24: Con1.24 Con2.24 | length 105
  Top Layer w8: Con2.24 Con1.24
NetCon1_25: Con1.25 Con2.25 | length 105
  Top Layer w8: Con2.25 Con1.25
NetCon1_26: Con1.26 Con2.26 | length 105
  Top Layer w8: Con2.26 Con1.26
NetCon1_27: Con1.27 Con2.27 | length 105
  Top Layer w8: Con2.27 Con1.27
NetCon1_28: Con1.28 Con2.28 | length 105
  Top Layer w8: Con2.28 Con1.28
NetCon1_29: Con1.29 Con2.29 | length 105
  Top Layer w8: Con2.29 Con1.29
NetCon1_30: Con1.30 Con2.30 | length 105
  Top Layer w8: Con2.30 Con1.30
NetCon1_31: Con1.31 Con2.31 | length 105
  Top Layer w8: Con2.31 Con1.31
NetCon1_32: Con1.32 Con2.32 | length 105
  Top Layer w8: Con2.32 Con1.32
NetCon1_33: Con1.33 Con2.33 | length 105
  Top Layer w8: Con2.33 Con1.33
NetCon1_34: Con1.34 Con2.34 | length 105
  Top Layer w8: Con2.34 Con1.34
NetCon1_35: Con1.35 Con2.35 | length 105
  Top Layer w8: Con2.35 Con1.35
NetCon1_36: Con1.36 Con2.36 | length 105
  Top Layer w8: Con2.36 Con1.36
NetCon1_37: Con1.37 Con2.37 | length 105
  Top Layer w8: Con2.37 Con1.37
NetCon1_38: Con1.38 Con2.38 | length 105
  Top Layer w8: Con2.38 Con1.38
NetCon1_39: Con1.39 Con2.39 | length 105
  Top Layer w8: Con2.39 Con1.39
NetL1_1: L1.1 U4.10 | length 83.1
  Top Layer w8: L1.1 1780.69,1556.1 U4.10
NetR1_1: R1.1 U3.1 U3.4 U5.1 U5.3 | length 1287.9
  Top Layer w8: U5.1 4790.31,1283.31 4848.31,1283.31 4870.38,1305.38 v1@4870.38,1326.73 ; U5.3 4794,1373 4847,1373 4870.38,1349.62 4870.38,1329.62 v1@4870.38,1326.73 ; v1(4870,1326.35) v1@4870.38,1326.73 ; U3.4 5146,1982.5 5153,1975.5 5153,1953.76 5192.26,1914.5 5221,1914.5 U3.1 5218.12,1907.5 5211.12,1900.5 R1.1@5211.12,1807.38 ; v1(5171.59,1853.16) 5171.59,1850.25 5208.96,1812.89 R1.1@5208.96,1807.89
  Bottom Layer w8: v1(4870,1326.35) 4870,1535 4870,1540 4870,1695 5028.76,1853.76 v1@5175.4,1853.76
NetR3_2: R3.2 U3.3 | length 83.3
  Top Layer w8: U3.3 5230,1984.5 R3.2
NetR6_1: R6.1 U5.7 | length 193.4
  Top Layer w8: R6.1@4420.31,1315 4420.31,1315.69 4429.97,1325.35 4434.62,1330 U5.7 ; R6.1 R6.1@4430.75,1324.82
NetR8_1: R8.1 U5.6 | length 173.6
  Top Layer w8: R8.1 4423.96,1380 U5.6
NetR11_1: R11.1 U4.13 | length 141.5
  Top Layer w8: R11.1@1911.26,1323.21 1911.73,1323.69 U4.13
NetR13_2: R13.2 U4.3 | length 855.8
  Top Layer w8: U4.3 1771.77,1693.9 1750,1715.66 1750,1850 1780,1880 1825,1880 2170.38,2225.38 2196.03,2225.38 R13.2@2196.99,2226.34
NetR14_2: R14.2 U4.4 | length 854.1
  Top Layer w8: U4.4 1734.34,1674.21 1715,1693.55 1715,1865 R14.2@2089.84,2239.84
NetR15_2: R15.2 U4.5 | length 895.3
  Top Layer w8: U4.5 1694.81,1654.53 1667.07,1682.27 1667.07,1892.07 1989.44,2214.44 1989.44,2239.99 R15.2
NetR16_2: R16.2 U4.6 | length 927.6
  Top Layer w8: U4.6 1661.78,1634.84 1625,1671.63 1625,1923.42 1890,2188.42 R16.2
NetR17_2: R17.2 U4.8 | length 970.3
  Top Layer w8: R17.2@1682,2239.36 1682,2177 1550,2045 1550,1660 1614.53,1595.47 U4.8
NetR18_2: R18.2 U4.7 | length 951.6
  Top Layer w8: R18.2 1784.26,2169.26 1586,1971 1586,1664 1634.84,1615.16 U4.7
NEW_CLK: Con2.18 U7.34 | length 2012.6
  Top Layer w8: U7.34 3559.29,1479.37 3566.52,1472.14 v1(3569.76,1472.14)
  Bottom Layer w8: v1(3569.76,1472.14) 3587.62,1490 4341.59,1490 5030,2178.41 Con2.18
NEW_VOUT_CS: J1.8 U4.14 U7.85 | length 2245.7
  Top Layer w8: U4.14 1931.42,1513.64 2020.33,1602.56 2020.33,1625.33 v1(2105,1710) ; J1.8@2290,2770 2290,2255 2385,2160 v1(2385,1865) ; U7.85 2840.11,1617.28 2880.96,1617.28 v1(2881.07,1617.39)
  Bottom Layer w8: v1(2105,1710) 2260,1865 v1(2385,1865) 2632.61,1617.39 v1(2881.07,1617.39)
PPU_CS: Con1.13 Con2.13 U9.8 | length 380
  Top Layer w8: Con1.13 4530,2309.55 4641.02,2198.52 U9.8
PPU_CS_3V3: U7.39 U9.12 | length 1339.3
  Top Layer w8: U7.39 4422.8,1577.8 4615.43,1770.43 U9.12
PPU_SIDE_D0_3V3: U7.54 U8.14 | length 518.2
  Top Layer w8: U7.54@3319.6,1858.24 3319.6,1920.63 3332.97,1934 3444.31,1934 3471.31,1907 3709.72,1907 3714.41,1902.31 U8.14
PPU_SIDE_D0_5V: Con2.2 U8.10 | length 453.1
  Top Layer w8: Con2.2 3430,2295 3560,2165 3725,2165 3740,2150 U8.10
PPU_SIDE_D1_3V3: U7.57 U8.15 | length 627.4
  Top Layer w8: U7.57@3260.55,1847.19 3260.55,1915.55 3297,1952 3451.77,1952 3478.77,1925 3720,1925 3740,1905 U8.15
PPU_SIDE_D1_5V: Con2.3 U8.9 | length 381.2
  Top Layer w8: Con2.3 3645,2195 3740,2195 3765.59,2169.41 U8.9
PPU_SIDE_D2_3V3: U7.58 U8.16 | length 686.6
  Top Layer w8: U7.58@3240.86,1865.58 3240.86,1925.86 3285,1970 3459.22,1970 3486.22,1943 3747,1943 3765.59,1924.41 U8.16
PPU_SIDE_D2_5V: Con2.4 U8.8 | length 318.2
  Top Layer w8: Con2.4 3715,2225 3755,2225 3790.87,2189.13 3790.87,2082.32 U8.8
PPU_SIDE_D3_3V3: U7.59 U8.17 | length 773.7
  Top Layer w8: U7.59@3221.18,1854.26 3221.18,1941.18 3268,1988 3466.68,1988 3493.68,1961 3766,1961 3791.18,1935.82 U8.17
PPU_SIDE_D3_5V: Con2.5 U8.7 | length 263.9
  Top Layer w8: Con2.5 3730,2300 3816.77,2213.23 U8.7
PPU_SIDE_D4_3V3: U7.60 U8.18 | length 838.7
  Top Layer w8: U7.60@3201.49,1863.38 3201.49,1951.49 3256,2006 3474.13,2006 3501.13,1979 3787,1979 3816.77,1949.23 U8.18
PPU_SIDE_D4_5V: Con2.6 U8.6 | length 233.1
  Top Layer w8: Con2.6 3841.28,2298.72 3841.28,2276.94 3842.36,2275.85 U8.6
PPU_SIDE_D5_3V3: U7.61 U8.19 | length 915.6
  Top Layer w8: U7.61@3181.81,1863.5 3181.81,1966.81 3239,2024 3481.59,2024 3508.59,1997 3808,1997 3842.36,1962.64 U8.19
PPU_SIDE_D5_5V: Con2.7 U8.5 | length 253.7
  Top Layer w8: U8.5 3867.95,2237.95 3930,2300 Con2.7
PPU_SIDE_D6_3V3: U7.62 U8.20 | length 989.2
  Top Layer w8: U7.62@3162.12,1864.33 3162.12,1982.12 3222,2042 3489.04,2042 3516.04,2015 3824.54,2015 3867.95,1971.59 U8.20
PPU_SIDE_D6_5V: Con2.8 U8.4 | length 284.5
  Top Layer w8: U8.4 3893.54,2173.54 Con2.8
PPU_SIDE_D7_3V3: U7.63 U8.21 | length 1063.2
  Top Layer w8: U7.63@3142.43,1859.13 3142.43,1997.05 3205.38,2060 3496.5,2060 3523.5,2033 3832,2033 3893.54,1971.46 U8.21
PPU_SIDE_D7_5V: Con2.9 U8.3 | length 353.4
  Top Layer w8: U8.3 3919.13,2154.13 3945,2180 4010,2180 4130,2300 Con2.9
PPU_SIDE_OE: U7.53 U8.22 | length 726.4
  Top Layer w8: U7.53@3338.92,1857.03 3338.92,1905.97 3348.95,1916 3436.85,1916 3547.85,1805 3905.68,1805 3919.13,1818.46 U8.22
PPU_VOUT: Con2.21 R3.1 | length 838.8
  Top Layer w8: R3.1 5230.98,2125.63 5295,2189.65 5295,2725 5230,2790 Con2.21
RGB_B0: U4.40 U7.76 | length 881.6
  Top Layer w8: U4.40@2069.03,1820 2069.03,1859.03 2104,1894 2320.43,1894 2418.6,1795.83 2855.27,1795.83 U7.76@2856.1,1795
RGB_B1: U4.39 U7.77 | length 886
  Top Layer w8: U4.39 2088.9,1848.9 2116,1876 2312.03,1876 2413.2,1774.83 U7.77@2858.29,1774.83
RGB_B2: U4.38 U7.78 | length 833.4
  Top Layer w8: U4.38 2108.77,1785.63 2108.77,1841.27 2125.5,1858 2302,1858 2404.85,1755.15 U7.78@2836.78,1755.15
RGB_B3: U4.37 U7.81 | length 796.5
  Top Layer w8: U4.37 2128.27,1835.31 2132.95,1840 2291.54,1840 2435.66,1695.88 2813.23,1695.88
RGB_B4: U4.36 U7.82 | length 683.6
  Top Layer w8: U4.36 2372.82,1733.27 2430.07,1676.02 2807.43,1676.02 ; 2807.45,1676.04 U7.82@2840.3,1676.04
RGB_B5: U4.35 U7.83 | length 658.6
  Top Layer w8: U4.35@2205,1713.77 2205.18,1713.58 2367.05,1713.58 2424.27,1656.37 U7.83@2839.83,1656.37
RGB_B6: U4.34 U7.84 | length 676.9
  Top Layer w8: U4.34 2361.28,1693.9 2418.14,1637.04 U7.84@2833.83,1637.04
RGB_B7: U4.33 U7.86 | length 685.3
  Top Layer w8: U4.33 2355.51,1674.21 2432.28,1597.44 U7.86@2833.96,1597.44
RGB_G0: U4.32 U7.87 | length 695.3
  Top Layer w8: U4.32 2349.74,1654.53 2426.75,1577.51 2807.36,1577.51 2807.45,1577.61 U7.87@2843.77,1577.61
RGB_G1: U4.31 U7.88 | length 691.2
  Top Layer w8: U4.31 2343.97,1634.84 2420.63,1558.18 U7.88@2839.93,1558.18
RGB_G2: U4.30 U7.96 | length 729.5
  Top Layer w8: U4.30@2200,1615.34 2200.18,1615.16 2338.2,1615.16 2553.38,1399.97 2806.98,1399.97 2807.45,1400.44 2839.81,1400.44 U7.96
RGB_G3: U4.29 U7.97 | length 753.8
  Top Layer w8: U4.29 2332.43,1595.47 2546.96,1380.94 U7.97@2845.43,1380.94
RGB_G4: U4.28 U7.98 | length 754.2
  Top Layer w8: U4.28 2326.65,1575.79 2541.07,1361.37 U7.98@2845.8,1361.37
RGB_G5: U4.27 U7.99 | length 773.9
  Top Layer w8: U4.27 2320.88,1556.1 2535.19,1341.8 2807.41,1341.8 2807.45,1341.76 U7.99@2865.52,1341.76
RGB_G6: U4.26 U7.1 | length 877
  Top Layer w8: U4.26 2315.11,1536.42 2623.1,1228.43 2899.85,1228.43 2906.21,1234.8 U7.1@2906.21,1255.86
RGB_G7: U4.25 U7.2 | length 915.4
  Top Layer w8: U4.25 2307.35,1516.73 2614.68,1209.4 2919.4,1209.4 2925.9,1215.9 U7.2@2925.9,1255.86
RGB_R0: U4.24 U7.3 | length 1009.7
  Top Layer w8: U4.24 2128.27,1421.73 2358.6,1191.4 2931.4,1191.4 2945.58,1205.58 U7.3@2945.58,1253.92
RGB_R1: U4.23 U7.4 | length 1082.4
  Top Layer w8: U4.23 2108.77,1464.37 2108.77,1413.97 2349.33,1173.4 2943.4,1173.4 2964.9,1194.9 U7.4@2964.9,1261.99
RGB_R2: U4.22 U7.7 | length 1165.1
  Top Layer w8: U4.22 2089.08,1464.37 2089.08,1408.2 2341.88,1155.4 2970.27,1155.4 3024.15,1209.28 U7.7
RGB_R3: U4.21 U7.8 | length 1226.1
  Top Layer w8: U4.21 2069.21,1402.61 2334.42,1137.4 2977.72,1137.4 3043.64,1203.32 3043.64,1255.68 U7.8
RGB_R4: U4.19 U7.9 | length 1297.3
  Top Layer w8: U4.19 2029.84,1416.53 2326.96,1119.4 2985.18,1119.4 3063.32,1197.55 U7.9@3063.32,1257.89
RGB_R5: U4.18 U7.10 | length 1356.3
  Top Layer w8: U4.18 2010.16,1410.75 2319.51,1101.4 2992.63,1101.4 3083.28,1192.05 U7.10@3083.28,1255.78
RGB_R6: U4.17 U7.12 | length 1410.8
  Top Layer w8: U4.17@1990.47,1449.81 1990.47,1404.98 2312.05,1083.4 3000.09,1083.4 3122.38,1205.69 U7.12@3122.38,1255.86
RGB_R7: U4.16 U7.13 | length 1486.7
  Top Layer w8: U4.16 1970.79,1399.21 2304.6,1065.4 3007.54,1065.4 3142.47,1200.33 3142.47,1219.42 3142.43,1219.46 U7.13@3142.43,1255.86
RGB_VCLK: U4.41 U7.14 | length 1919.1
  Top Layer w8: v1(2012.63,1323.43) 2012.63,1322.37 2287.6,1047.4 3015,1047.4 3161.93,1194.34 U7.14 ; v1@2049.53,1715.47 U4.41
  Bottom Layer w8: v1(2012.63,1323.43) 2116.94,1427.74 2116.94,1648.06 v1(2050,1715)
ROUT: C18.2 J1.7 | length 242.9
  Top Layer w8: C18.2@2190,2527.09 J1.7@2190,2770
RST_3V3: U7.43 U11.15 | length 975.1
  Top Layer w8: U7.43 4199.67,1656.54 4296.16,1753.02 U11.15@4296.16,1836.49
SRC_CLK: R12.1 U7.35 | length 194.2
  Top Layer w8: U7.35 3582.88,1499.06 3604.28,1477.66 3604.28,1464.94 R12.1@3613.36,1455.85
SUBCARRIER: U4.15 U7.15 | length 1610.6
  Top Layer w8: U4.15 1951.1,1350.9 2272.6,1029.4 2302.86,1029.4 3022.46,1029.4 3181.81,1188.75 U7.15@3181.81,1255.86
TCK: J3.4 U7.91 | length 1148.9
  Top Layer w8: v1(2665.19,1474.29) 2689.77,1498.87 2839.81,1498.87 U7.91
  Bottom Layer w8: J3.4 1909.88,1125 1925.14,1140.26 1925.26,1140.26 2303.85,1518.85 2641.15,1518.85 2665.19,1494.81 v1(2665.19,1474.29)
TDI: J3.5 U7.94 | length 1041.7
  Top Layer w8: v1@2639.95,1450.29 2698.28,1450.29 2708.57,1440 U7.94
  Bottom Layer w8: J3.5 2366.67,1496.67 2625.9,1496.67 2639.42,1483.14 v1(2639.42,1449.76)
TDO: J3.3 U7.95 | length 1342.4
  Top Layer w8: v1(2668.79,1424.9) 2669.38,1424.32 2690.79,1424.32 2694.79,1420.31 U7.95
  Bottom Layer w8: J3.3 1905,1235 1960,1235 2264.33,1539.33 2654.34,1539.33 2690.37,1503.31 2690.37,1446.48 v1(2668.79,1424.9)
TMS: J3.6 U7.90 | length 911.5
  Top Layer w8: v1(2612.42,1471.03) 2660.13,1518.74 U7.90
  Bottom Layer w8: J3.6 2095,1130.82 2435.21,1471.03 v1(2612.42,1471.03)
VBL: Con1.19 Con2.19 U9.3 | length 586.7
  Top Layer w8: U9.3 4768.98,2125.09 4833.89,2190 5010,2190 Con2.19 Con1.19
VBL_3V3: U7.30 U9.17 | length 1559.2
  Top Layer w8: U7.30 4245.63,1400.63 4315,1470 4474.73,1470 4743.39,1738.65 U9.17
VOUT: C19.1 J1.4 | length 356.8
  Top Layer w8: C19.1 1685.84,2503.21 1685.84,2534.18 v1(1718.99,2567.32)
  Bottom Layer w8: v1(1718.99,2567.32) 1883.08,2731.41 1883.08,2763.08 J1.4@1890,2770
VOUT_BLANK: R6.2 U7.27 | length 926.5
  Top Layer w8: U7.27@3444.69,1341.39 4333.3,1341.39 4344.39,1330.29 4345.38,1330.29 4359.68,1315.98 R6.2@4359.68,1315
VOUT_CS: U2.1 U7.29 | length 1656.8
  Top Layer w8: U7.29 4260.94,1380.94 4328.18,1448.18 4486.36,1448.18 4730.64,1692.45 U2.1@4972.22,1692.45
YOUT: C24.1 J1.3 | length 285.3
  Top Layer w8: J1.3@1790,2770 1790,2705 1888.84,2606.16 C24.1@1888.84,2525.6
pads on no net: Con1.21 U4.11 U4.12 U4.44 U6.23 U7.16 U7.17 U7.18 U7.19 U7.20 U7.21 U7.24 U7.25 U7.32 U7.52 U7.89 U8.23 U9.11 U9.18

## Polygon pours and split planes (outlines as drawn)
GND on Top Layer "GND_L01_P002" (solid, pour order 2): 1464.28,1104.59 ccw(c1564.06,1104.83) 1564.15,1005.05 5223.7,1005.39 ccw(c5223.7,1010.38) 5223.71,1005.39 ccw(c5223.46,1111.67) 5329.74,1111.67 ccw(c5223.46,1111.67) 5329.74,1111.77 5330.12,3009.32 cw(c5324.69,3009.32) 5330.12,3009.33 ccw(c5238.72,3009.11) 5238.63,3100.52 1564.58,3100.67 cw(c1564.57,3095.7) 1564.57,3100.67 ccw(c1564.8,3000.84) 1464.98,3000.74 1464.28,1104.61 ccw(c1469.13,1104.61)
+3.3 on Top Layer "+3.3_L01_P000" (solid, pour order 0): 2860,1840 3425,1840 3425,1275 2860,1275
GND on Bottom Layer "GND_L02_P001" (solid, pour order 1): 1464.28,1104.59 ccw(c1564.06,1104.83) 1564.15,1005.05 5223.7,1005.39 ccw(c5223.7,1010.38) 5223.71,1005.39 ccw(c5223.46,1111.67) 5329.74,1111.67 ccw(c5223.46,1111.67) 5329.74,1111.77 5330.12,3009.32 cw(c5324.69,3009.32) 5330.12,3009.33 ccw(c5238.72,3009.11) 5238.63,3100.52 1564.58,3100.67 cw(c1564.57,3095.7) 1564.57,3100.67 ccw(c1564.8,3000.84) 1464.98,3000.74 1464.28,1104.61 ccw(c1469.13,1104.61)

## Keep-outs
Keep-Out Layer:
  lines w10: 1469.3,1104.61 ccw(c1564.06,1104.83) 1564.15,1010.07 5223.7,1010.4 ccw(c5223.46,1111.67) 5324.72,1111.77 5325.1,3009.32 ccw(c5238.72,3009.11) 5238.63,3095.5 1564.58,3095.65 ccw(c1564.8,3000.84) 1469.99,3000.75 1469.3,1104.61

## Silkscreen, mask and mechanical layers (free items; w line width, h text height)
Top Overlay:
  lines w10: 1638,2345 2245,2345 2270,2370 2640,2370
  text "Lava RGB" at 3610,1251.02 h96
  text "Ver  1.1" at 3607.19,1181.87 h96
  text "VCC" at 1621.21,1175.87 h42 r90
  text "GND" at 1717,1173 h42 r90
  text "TMS" at 2122.11,1170.92 h42 r90
  text "TDO" at 1821.16,1170.22 h42 r90
  text "TCK" at 1921.94,1169.76 h42 r90
  text "TDI" at 2021,1169.76 h42 r90
  text "Designed In China" at 3604.52,1108.86 h96

## Text inside footprints (layer, text, board x,y; h text height)
J1: Top Overlay "C" at 1715.97,2675.8 h47.24 r90; Top Overlay "CS#" at 2311.07,2599.23 h42 r90; Top Overlay "R" at 2216.64,2680.24 h47.24 r90; Top Overlay "G" at 2115.32,2678.4 h47.24 r90; Top Overlay "B" at 2013.08,2679.32 h47.24 r90; Top Overlay "Y" at 1815.97,2675.8 h47.24 r90; Top Overlay "V" at 1915.97,2675.8 h47.24 r90; Top Overlay "GND" at 1610,2590 h42 r90
J2: Top Overlay "DATA" at 2615,2550 h42 r90; Top Overlay "CLK" at 2520,2595 h42 r90; Top Overlay "RST" at 2415,2595 h42 r90; Top Overlay "LATCH" at 2720,2510 h42 r90
U2: Mechanical 13 "*" at 4929.5,1688.5 h50
U3: Mechanical 13 "*" at 5250.5,1911.5 h50 r180
U5: Mechanical 13 "*" at 4809.5,1263 h50 r180
U7: Mechanical 13 "*" at 2921.19,1285.11 h50 r90